# Altium PCB Thunderscope_Rev5.3.PcbDoc (part 14 of 14)
Units mil, origin at the board's own origin, x right, y up, seen from the top; angles counter-clockwise.
Board outline 3937.01 x 3838.58 mil, 6 copper layers (F.Cu, In1.Cu (GND), In2.Cu (Sign), In3.Cu (Sign), In4.Cu (GND), B.Cu), stack 60.556 mil thick; 911 components, 486 nets, 2834 pads, 2761 vias.
Unrouted connection lines stored in the file: 618.
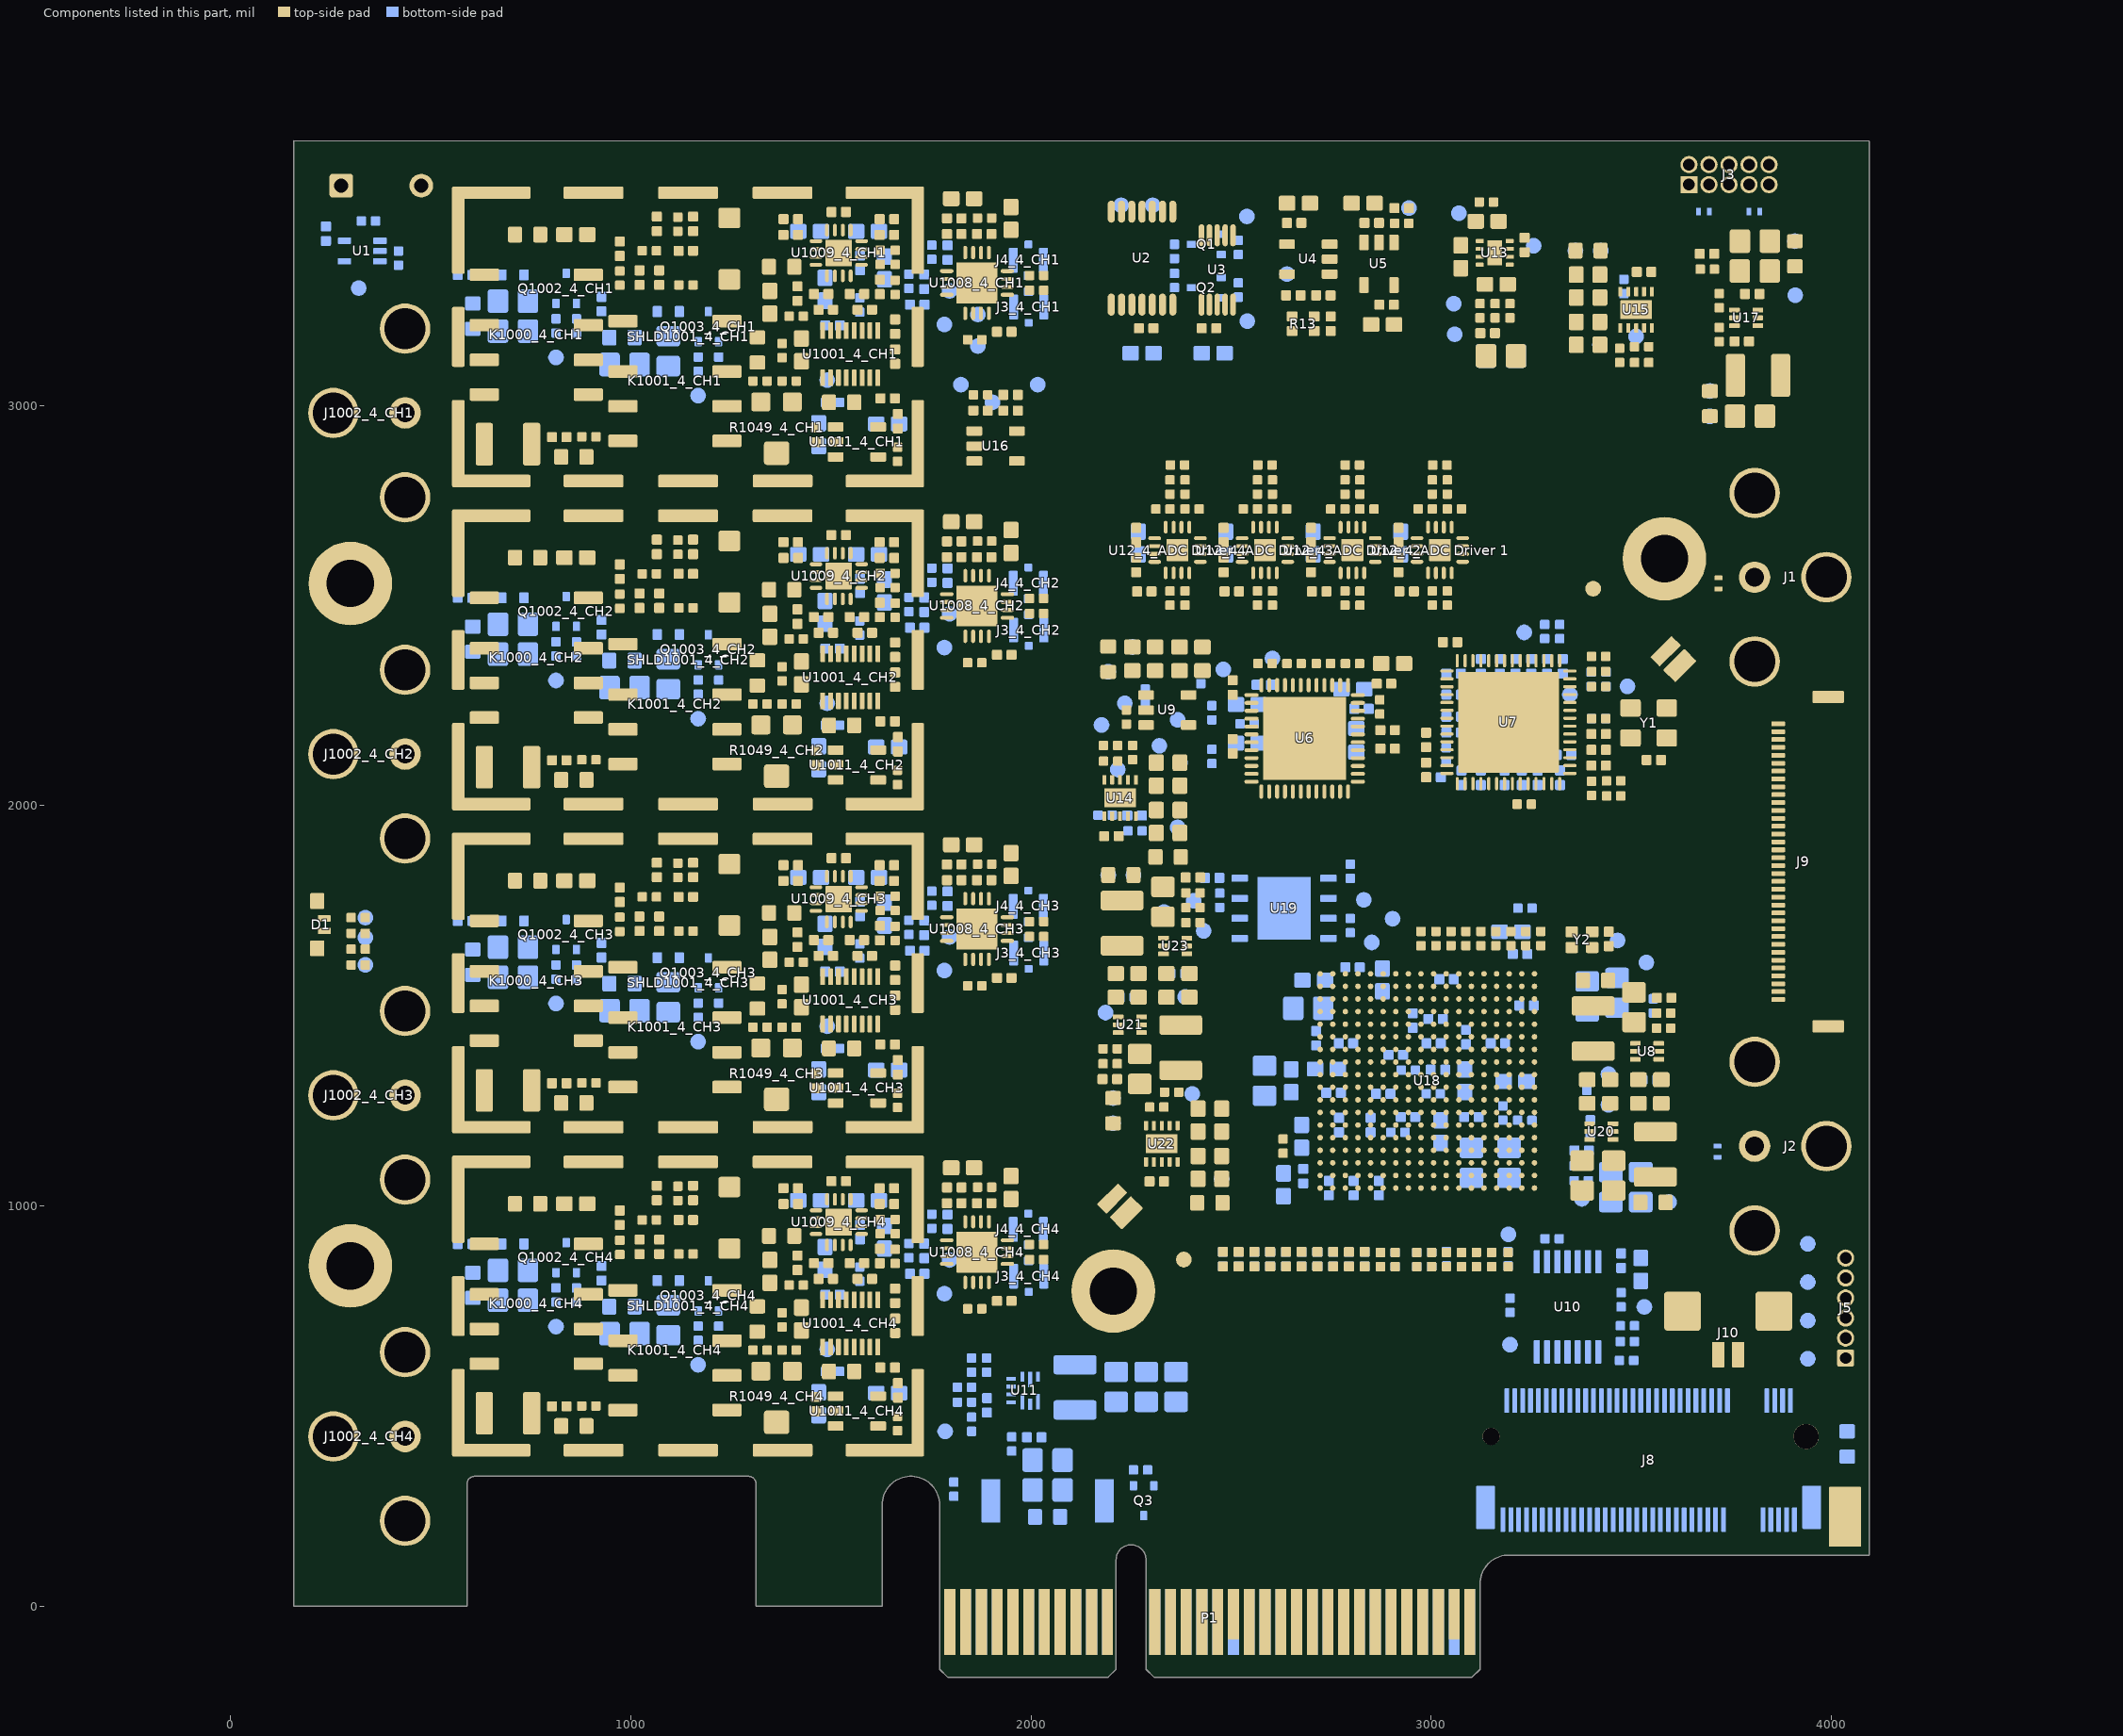
[diagram p17: the components of this part, seen from the top]

## Other copper (continued)
In1.Cu (GND):
  text "1" at 1399.76,278.78 h70
In2.Cu (Sign):
  text "3" at 1439.13,278.46 h70
In3.Cu (Sign):
  text "1" at 1478.5,278.78 h70
In4.Cu (GND):
  text "2" at 1517.87,278.67 h70
B.Cu:
  pour cut-out: 1771.65,43.31 3122.05,43.31 3122.05,-177.17 1771.65,-177.17

## Silkscreen, mask and mechanical layers (free items; w line width, h text height)
F.SilkS:
  lines w10: 2013.78,847.44 2013.78,711.61 1741.39,711.61 1741.39,364.28 544.54,364.28 544.54,1135.93 2013.78,1135.93 2013.78,922.24 ; 2013.78,1654.53 2013.78,1518.7 1741.39,1518.7 1741.39,1171.36 544.54,1171.36 544.54,1943.02 2013.78,1943.02 2013.78,1729.33 ; 2013.78,2461.61 2013.78,2325.79 1741.39,2325.79 1741.39,1978.45 544.54,1978.45 544.54,2750.1 2013.78,2750.1 2013.78,2536.42 ; 2013.78,3268.7 2013.78,3132.87 1741.39,3132.87 1741.39,2785.54 544.54,2785.54 544.54,3557.19 2013.78,3557.19 2013.78,3343.5 ; 1809.06,2810.83 2013.78,2810.83 2013.78,3066.73 1809.06,3066.73 1809.06,2810.83 ; 2157.48,3135.83 2544.49,3135.83 2544.49,3557.09 2157.48,3557.09 2157.48,3135.83 ; 2163.39,1119.32 2303.37,979.33 3625,979.33 3625,2285.21 3485.01,2425.2 2163.39,2425.2 2163.39,1119.32 ; 2218.21,2470.47 3112.71,2470.47 3112.71,2882.38 2218.21,2882.38 2218.21,2470.47 ; 2583.86,3135.83 2985.43,3135.83 2985.43,3557.09 2583.86,3557.09 2583.86,3135.83 ; 3024.8,3066.93 3273.82,3066.93 3273.82,3556.89 3024.8,3556.89 3024.8,3066.93 ; 3313.19,3066.93 3592.72,3066.93 3592.72,3436.02 3313.19,3436.02 3313.19,3066.93 ; 3632.09,2913.39 3956.89,2913.39 3956.89,3475.39 3632.09,3475.39 3632.09,2913.39
  text "CH1" at 2062.07,3437.1 h51.18 r90
  text "Be Gay" at 781.44,3141.11 h39.37 r90
  text "DC Offset Ctrl" at 2181.1,3090.55 h51.18
  text "DC Bias" at 2708.66,3090.55 h51.18
  text "Do Crime" at 1121.89,3035.55 h39.37 r90
  text "-5V CP" at 3074.8,3023.62 h51.18
  text "+5V LDO" at 3366.14,3019.68 h51.18
  text "+5V3 Boost" at 3669.29,2866.14 h51.18
  text "PGA LDO" at 2066.93,2862.2 h51.18 r90
  text "CH2" at 2062.07,2629 h51.18 r90
  text "ADC Drivers" at 3150.32,2538.19 h51.18 r90
  text "CH3" at 2062.11,1822.11 h51.18 r90
  text "PCIe Added and Removed Here :-)" at 3681.1,1311.02 h51.18 r90
  text "Acquisition System" at 2100,1180 h51.18 r90
  text "CH4" at 2062.07,1014.65 h51.18 r90
  text "Free Palestine" at 2543.31,988.25 h39.37 r90
  text "FAN" at 3555,707 h51.18 r90
B.SilkS:
  text "TRIM_SCL_5V" at 2454.55,3541.85 h39.37
  text "TRIM_SDA_5V" at 2231.71,3538.81 h39.37
  text "-VBIAS" at 2909.75,3478.83 h39.37
  text "TRIM_SCL" at 2718.18,3461.66 h39.37
  text "+5V3_R_CP" at 3151.71,3431.99 h39.37
  text "+5V3_R_LDO" at 3460.63,3421.26 h39.37
  text "+5V3" at 3871.65,3404.54 h39.37
  text "FE_EN" at 3224.82,3389.42 h39.37
  text "+5V3" at 3531.5,3377.95 h39.37
  text "CH1_P" at 2140.02,3353.77 h39.37
  text "+VBIAS" at 2779.89,3316.39 h39.37
  text "COMP" at 292,3282 h39.37
  text "+VUSB" at 3877.68,3272.82 h39.37
  text "TRIM1" at 1911.77,3272.1 h39.37
  text "-5V_R" at 3018.91,3244.71 h39.37
  text "CH1_N" at 2148.13,3229.94 h39.37
  text "TRIM_SDA" at 2721.9,3197.11 h39.37
  text "PGA_CS1" at 1754.96,3189.74 h39.37
  text "*shifts your levels*" at 2502.04,3183.39 h31.5 r350
  text "PGA_SDIO" at 1950.68,3179.31 h39.37
  text "-5V" at 3018.22,3165.93 h39.37
  text "FE_PG" at 3624.95,3161.9 h39.37
  text "+5V" at 3387.65,3146.34 h39.37
  text "PGA_SCLK" at 1838.04,3135.86 h39.37
  text "TERM1" at 784.92,3107.19 h39.37
  text "CPL1" at 1457.93,3055.58 h39.37
  text "+5V_R_PGA" at 1791.34,3051.18 h39.37
  text "+3V3_PGA" at 2191.69,3041.99 h39.37
  text "+VUSB" at 3667.57,3024.22 h39.37
  text "ATTEN1" at 1139.01,3012.19 h39.37
  text "+5V" at 1877.07,2995.86 h39.37
  text "+VUSB_R" at 3666,2962 h39.37
  text "Your hardware is yours / You have the right to modify it / - Abortion Rights / - Trans Rights / - Right to Repair" at 2874.02,2795.28 h39.37
  text "CH2_P" at 2141.4,2550.4 h39.37
  text "TRIM2" at 1914.34,2465.59 h39.37
  text "+VUSB_R_ACQ" at 2416.31,2434.34 h39.37
  text "CH2_N" at 2141.4,2427.42 h39.37
  text "PLL_RSTn" at 3198.82,2425.23 h39.37
  text "PGA_CS2" at 1934.77,2384.39 h39.37
  text "+3V3_ACQ" at 2564.04,2376.77 h39.37
  text "VCM" at 2689.91,2355.1 h39.37
  text "+VUSB" at 2163.94,2327.21 h39.37
  text "TERM2" at 779.53,2306.39 h39.37
  text "PLL_SDA" at 3643.98,2285.37 h39.37
  text "PLL_SCL" at 3311.61,2267.66 h39.37
  text "CPL2" at 1457.4,2249.48 h39.37
  text "ADC_CSn" at 2206.2,2247.89 h39.37
  text "ATTEN2" at 1134.84,2210.92 h39.37
  text "ACQ_EN" at 2142.72,2193.86 h39.37
  text "ADC_SDATA" at 2434.75,2172.86 h39.37
  text "ADC_SCLK" at 2300.42,2125.75 h39.37
  text "ACQ_PG" at 2189.71,2080.65 h39.37
  text "+1V8_ACQ" at 2441.04,2055.86 h39.37
  text "+2V5_R_ACQ" at 2575.19,1939.06 h39.37
  text "FPGA FLASH" at 2710.26,1877.02 h39.37
  text "+2V5_R" at 2317.13,1859.38 h39.37
  text "+2V5" at 2154,1818 h39.37
  text "QSPI_DQ1" at 3009.05,1758.86 h39.37
  text "CH3_P" at 2136.28,1742.25 h39.37
  text "QSPI_DQ3" at 2376.8,1741.2 h39.37
  text "QSPI_DQ0" at 2303.44,1716.61 h39.37
  text "LED_G" at 301.18,1708.66 h39.37
  text "QSPI_CS" at 3059,1708 h39.37
  text "QSPI_CLK" at 2406.44,1676.88 h39.37
  text "TRIM3" at 1916.88,1663.95 h39.37
  text "LED_B" at 301.18,1661.42 h39.37
  text "+3V3" at 3570.26,1655.54 h39.37
  text "QSPI_DQ2" at 3022.92,1626.03 h39.37
  text "CH3_N" at 2137.72,1622.3 h39.37
  text "+3V3_R" at 3674.08,1600.88 h39.37
  text "LED_R" at 301.18,1590.55 h39.37
  text "PGA_CS3" at 1934.99,1578.71 h39.37
  text "PG_1V8" at 2520.71,1510.51 h39.37
  text "TERM3" at 779.53,1499.19 h39.37
  text "PG_1V0" at 2320.52,1468.25 h39.37
  text "CPL3" at 1457.4,1442.36 h39.37
  text "ATTEN3" at 1134.84,1403.71 h39.37
  text "DONE" at 3409.45,1323.02 h39.37
  text "+1V2_MGT" at 2378.22,1269.48 h39.37
  text "+1V8_R" at 2175.03,1261.16 h39.37
  text "FPGA_EN" at 3601.87,1237.29 h39.37
  text "+1V8" at 2173.7,1194.4 h39.37
  text "+1V8_R_LDO" at 2448.75,1059.24 h39.37
  text "+1V0_R" at 3347.94,1007.86 h39.37
  text "+1V0" at 3690.75,999.38 h39.37
  text "JTAG" at 4073,934 h39.37
  text "CH4_P" at 2137.14,929.3 h39.37
  text "PERST#" at 3166.61,921.5 h39.37
  text "TRIM4" at 1915.63,857.32 h39.37
  text "TCK" at 3964.26,852 h39.37
  text "CH4_N" at 2138.29,813.28 h39.37
  text "SYNC LVDS / XCVR" at 3649.61,807.09 h39.37
  text "PGA_CS4" at 1933.22,769.33 h39.37
  text "TDO" at 3962.74,759.22 h39.37
  text "SYNC_DE" at 3687,738 h39.37
  text "TERM4" at 779.53,692.22 h39.37
  text "TDI" at 3966.04,661.11 h39.37
  text "SYNC_REn" at 3169.29,644.25 h39.37
  text "+VUSB BUCK" at 2363,636 h39.37
  text "CPL4" at 1457.4,635.3 h39.37
  text "ATTEN4" at 1134.84,596.75 h39.37
  text "TMS" at 3964.52,568.07 h39.37
  text "+VUSB_PG" at 1748.03,425.2 h39.37
  text "+12V_R" at 1952.35,332.17 h39.37
  text "+12V" at 2219,328 h39.37
F.Mask:
  drawing of 21 lines, arcs and shapes, not listed
  text "ThunderScope Rev.5.3" at 3305.47,163.5 h62.99
  text "MB" at 371,37 h157.48
B.Mask:
  rectangle: 1354.33,267.72 1590.55,322.83
  rectangle: 1761.81,-187.01 3131.89,48.23
  dashed: 1627.95,4.92 1312.99,4.92 1312.99,135.83 1627.95,135.83
  dashed: 1627.95,4.92 1312.99,4.92 1312.99,135.83 1627.95,135.83
  dashed: 3122.05,-177.17 1771.65,-177.17 1771.65,43.31 3122.05,43.31
  lines w1: 1354.33,267.72 1590.55,267.72 1590.55,322.83 1354.33,322.83 1354.33,267.72
Mechanical 1:
  the board outline again, w3.94
F.Fab:
  lines w10: 157.48,0 590.55,0 590.55,324.8 1313.98,324.8 1313.98,0 1627.95,0
  text "DO NOT BREAK TAB ->" at -89.5,-11.19 h39.37
B.Fab:
  lines w10: 157.48,0 590.55,0 590.55,324.8 1313.98,324.8 1313.98,0 1627.95,0
  text "<- DO NOT BREAK TAB" at 137.8,-11.19 h39.37
Drill Drawing:
  circle w10: c242.48,5119.01 r27.55
  circle w10: c242.48,4623.18 r16.53
  circle w10: c242.48,4623.18 r27.55
  lines w10: 214.93,4223.76 242.48,4237.54 270.03,4223.76 256.25,4251.31 270.03,4278.85 242.48,4265.08 214.93,4278.85 228.71,4251.31 214.93,4223.76 ; 214.93,4402.81 270.03,4402.81 242.48,4347.72 214.93,4402.81 ; 214.93,4499.22 242.48,4471.68 270.03,4499.22 242.48,4526.77 214.93,4499.22 ; 214.93,4774.68 270.03,4774.68 242.48,4719.59 214.93,4774.68 ; 214.93,4857.32 228.71,4857.32 242.48,4843.55 256.25,4857.32 270.03,4857.32 256.25,4871.1 270.03,4884.87 256.25,4884.87 242.48,4898.64 228.71,4884.87 214.93,4884.87 228.71,4871.1 214.93,4857.32 ; 214.93,4967.51 270.03,4967.51 270.03,5022.6 214.93,5022.6 214.93,4967.51 ; 225.95,4391.79 259.01,4391.79 242.48,4358.74 225.95,4391.79
  lines w15: 164.98,4186.58 5925.46,4186.58 ; 164.98,5178.23 5925.46,5178.23 ; 483.73,4062.62 483.73,5302.19 ; 805.75,4062.62 805.75,5302.19 ; 1382.41,4062.62 1382.41,5302.19 ; 1629.61,4062.62 1629.61,5302.19 ; 1989.5,4062.62 1989.5,5302.19 ; 2481.82,4062.62 2481.82,5302.19 ; 2776.67,4062.62 2776.67,5302.19 ; 3161.94,4062.62 3161.94,5302.19 ; 4314.03,4062.62 4314.03,5302.19 ; 4700.99,4062.62 4700.99,5302.19 ; 5302.71,4062.62 5302.71,5302.19 ; 164.98,4062.62 5925.46,4062.62 5925.46,5302.19 164.98,5302.19 164.98,4062.62
  text "Symbol" at 239.35,5215.42 h72
  text "Count" at 520.92,5215.42 h72
  text "Hole Size" at 842.93,5215.42 h72
  text "Plated" at 1419.59,5215.42 h72
  text "Hole Type" at 1666.79,5215.42 h72
  text "Drill Layer Pair" at 2026.68,5215.42 h72
  text "Via/Pad" at 2519.01,5215.42 h72
  text "Pad Shape" at 2813.86,5215.42 h72
  text "Template" at 3199.12,5215.42 h72
  text "Description" at 4351.22,5215.42 h72
  text "Hole Tolerance (+)" at 4738.18,5215.42 h72
  text "Hole Tolerance (-)" at 5339.9,5215.42 h72
  text "1" at 520.92,5091.46 h60
  text "1.092mm (43.00mil)" at 842.93,5091.46 h60
  text "PTH" at 1419.59,5091.46 h60
  text "Round" at 1666.79,5091.46 h60
  text "F.Cu - B.Cu" at 2026.68,5091.46 h60
  text "Pad" at 2519.01,5091.46 h60
  text "Rounded" at 2813.86,5091.46 h60
  text "c109h109m109" at 3199.12,5091.46 h60
  text "1" at 520.92,4967.51 h60
  text "1.600mm (63.00mil)" at 842.93,4967.51 h60
  text "PTH" at 1419.59,4967.51 h60
  text "Round" at 1666.79,4967.51 h60
  text "F.Cu - B.Cu" at 2026.68,4967.51 h60
  text "Pad" at 2519.01,4967.51 h60
  text "Rounded" at 2813.86,4967.51 h60
  text "c160h160m160" at 3199.12,4967.51 h60
  text "2" at 520.92,4843.55 h60
  text "0.900mm (35.43mil)" at 842.93,4843.55 h60
  text "PTH" at 1419.59,4843.55 h60
  text "Round" at 1666.79,4843.55 h60
  text "F.Cu - B.Cu" at 2026.68,4843.55 h60
  text "Pad" at 2519.01,4843.55 h60
  text "(Mixed)" at 2813.86,4843.55 h60
  text "(Mixed)" at 3199.12,4843.55 h60
  text "4" at 520.92,4719.59 h60
  text "3.000mm (118.11mil)" at 842.93,4719.59 h60
  text "PTH" at 1419.59,4719.59 h60
  text "Round" at 1666.79,4719.59 h60
  text "F.Cu - B.Cu" at 2026.68,4719.59 h60
  text "Pad" at 2519.01,4719.59 h60
  text "Rounded" at 2813.86,4719.59 h60
  text "c530h300z350x350m530mx350_2670034071" at 3199.12,4719.59 h60
  text "6" at 520.92,4595.63 h60
  text "1.200mm (47.24mil)" at 842.93,4595.63 h60
  text "PTH" at 1419.59,4595.63 h60
  text "Round" at 1666.79,4595.63 h60
  text "F.Cu - B.Cu" at 2026.68,4595.63 h60
  text "Pad" at 2519.01,4595.63 h60
  text "Rounded" at 2813.86,4595.63 h60
  text "c200h120m200" at 3199.12,4595.63 h60
  text "16" at 520.92,4471.68 h60
  text "0.740mm (29.13mil)" at 842.93,4471.68 h60
  text "PTH" at 1419.59,4471.68 h60
  text "Round" at 1666.79,4471.68 h60
  text "F.Cu - B.Cu" at 2026.68,4471.68 h60
  text "Pad" at 2519.01,4471.68 h60
  text "(Mixed)" at 2813.86,4471.68 h60
  text "(Mixed)" at 3199.12,4471.68 h60
  text "18" at 520.92,4347.72 h60
  text "2.600mm (102.36mil)" at 842.93,4347.72 h60
  text "PTH" at 1419.59,4347.72 h60
  text "Round" at 1666.79,4347.72 h60
  text "F.Cu - B.Cu" at 2026.68,4347.72 h60
  text "Pad" at 2519.01,4347.72 h60
  text "Rounded" at 2813.86,4347.72 h60
  text "c320h260m320" at 3199.12,4347.72 h60
  text "2761" at 520.92,4223.76 h60
  text "0.300mm (11.81mil)" at 842.93,4223.76 h60
  text "PTH" at 1419.59,4223.76 h60
  text "Round" at 1666.79,4223.76 h60
  text "F.Cu - B.Cu" at 2026.68,4223.76 h60
  text "Via" at 2519.01,4223.76 h60
  text "Rounded" at 2813.86,4223.76 h60
  text "(Mixed)" at 3199.12,4223.76 h60
  text "2809 Total" at 520.92,4099.81 h60

## Dimensions
157.48,3661.42 to 4094.49,3660.49 on Mechanical 1
1791.34,-177.17 to 157.48,3661.42 on Mechanical 1

## Text inside footprints (layer, text, board x,y; h text height)
J8: B.Fab "1" at 3201.71,108.97 h39.37; B.SilkS "1" at 3156.5,154.45 h39.37